# Altium PCB DT01.PcbDoc (part 3 of 3)
Units mil, origin at the board's own origin, x right, y up, seen from the top; angles counter-clockwise.
Board outline 2134.7 x 2226.1 mil, 2 copper layers (Top Layer, Bottom Layer), stack 57.918 mil thick; 95 components, 87 nets, 468 pads, 300 vias.
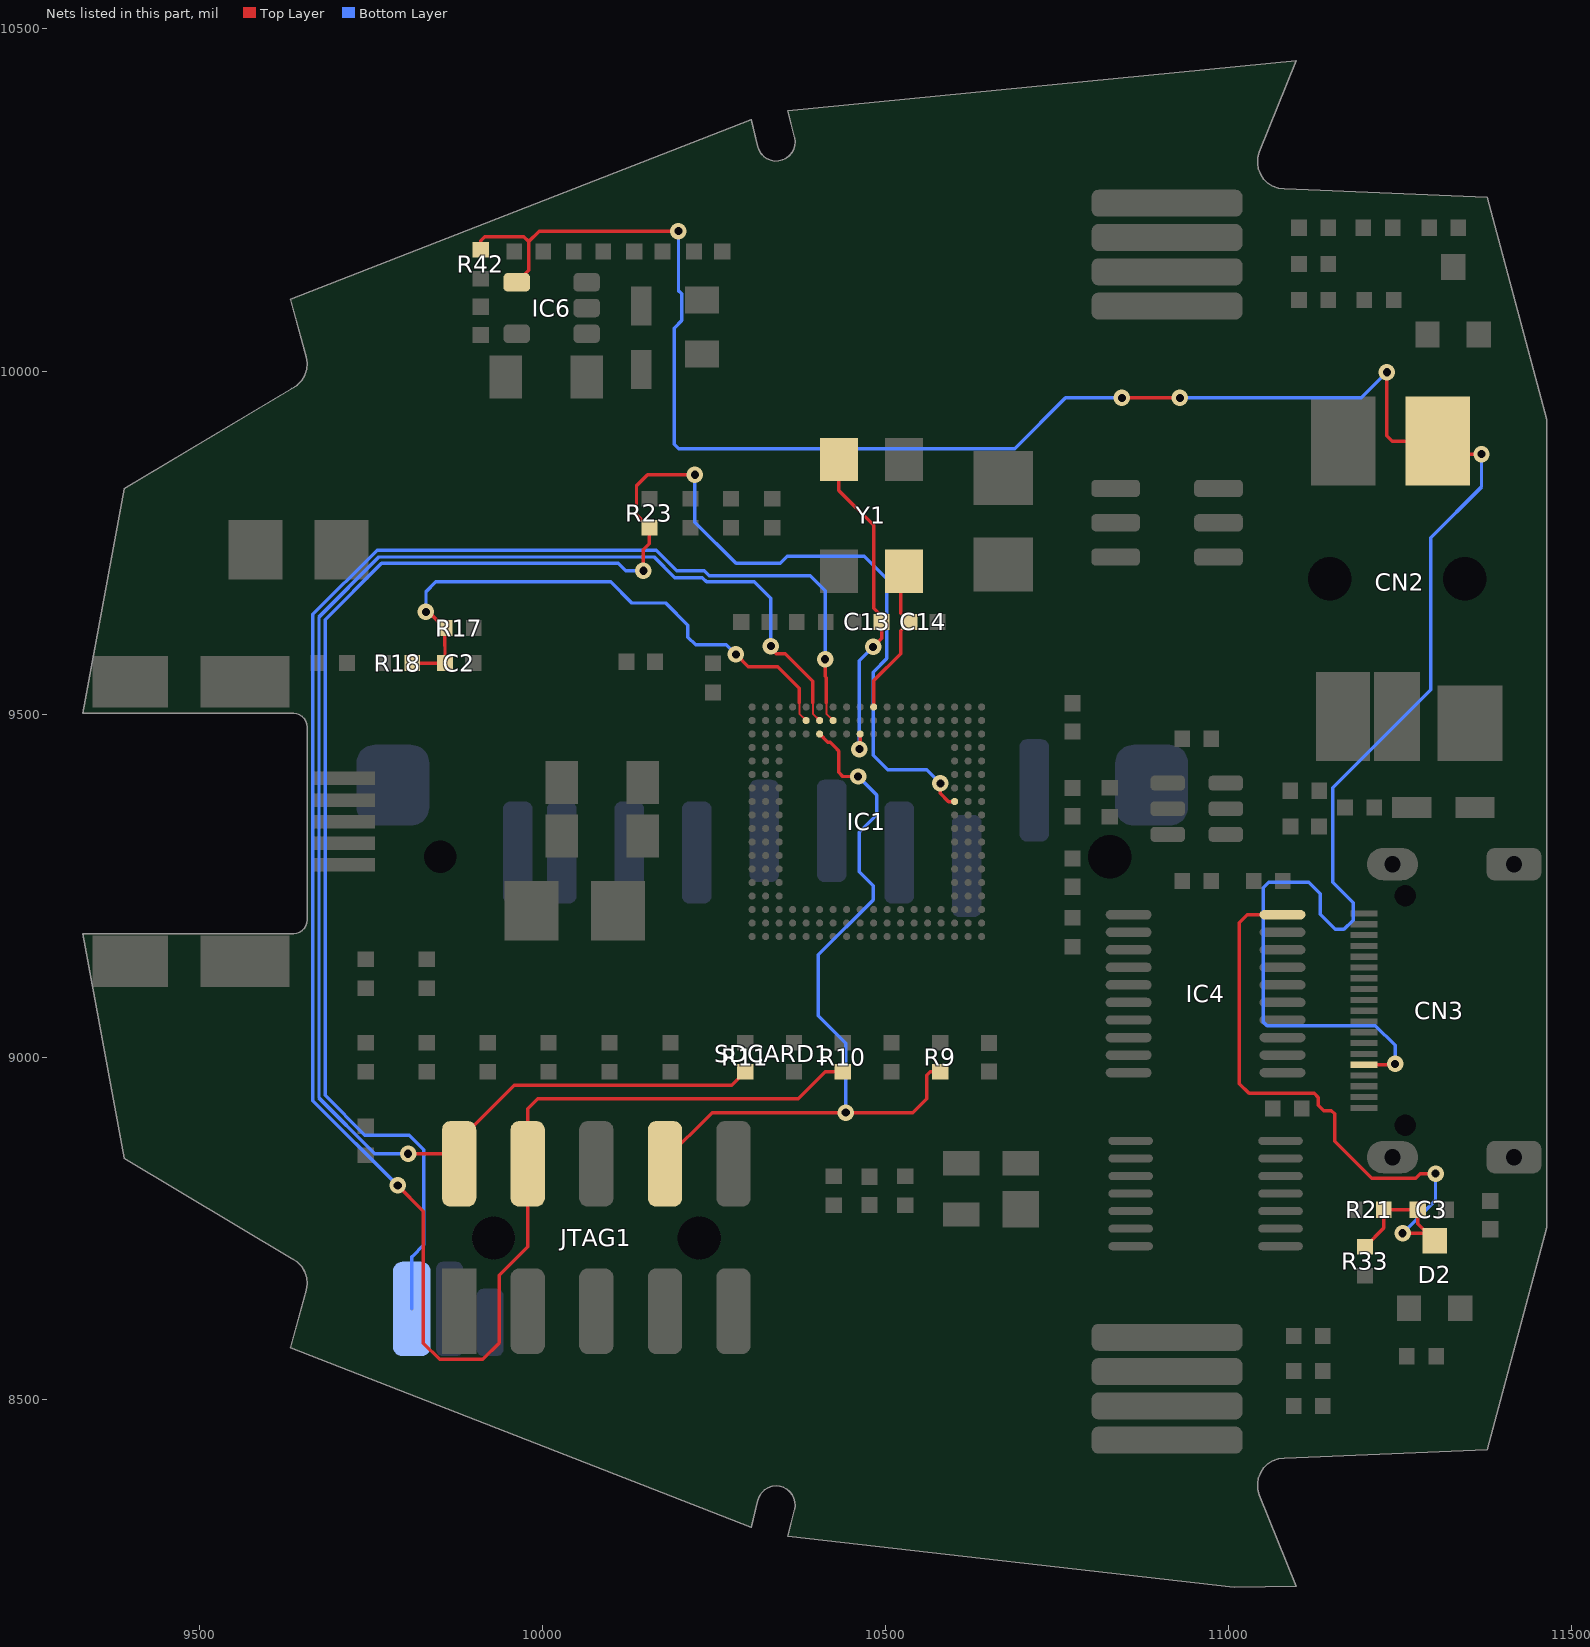
[diagram p3: the nets of this part, all layers, seen from the top]

## Via types
v1: diameter 24, hole 11.81, Top Layer to Bottom Layer, tented both sides, 295 vias
v2: diameter 24.02, hole 11.81, Top Layer to Bottom Layer, tented both sides, 5 vias

## Nets (pads, with @x,y where several pads share a name; then routed paths per layer and width w, separated by ;. In a path a pad name is that pad's centre, name@x,y a point inside that pad or via, vN(x,y) a via of type N, cw(c..) or ccw(c..) an arc to the next point about the centre after c; other vN are vias at no path point) (continued)
TDO: IC1.U13 JTAG1.2 R11.1 | length 2361.9
  Top Layer w3: 10394.06,9516.79 10394.06,9500.5 IC1.U13@10403.95,9490.61
  Top Layer w5: v1(9804.01,8859.02) JTAG1.2@9873.01,8859.02 ; JTAG1.2@9878.38,8844.21 9878.38,8878.67 9958.73,8959.02 10276.11,8959.02 R11.1@10295.6,8978.5 R11.1@10293.01,8978.5 ; v1@10333.01,9596.02 10341.01,9588.02 10354.01,9588.02 10394.06,9547.97 10394.06,9516.79
  Bottom Layer w5: v1(9804.01,8859.02) 9755.25,8859.02 9674,8940.26 9674,9641.59 9761.43,9729.02 10163.01,9729.02 10193.01,9699.02 10233.01,9699.02 10239.02,9693 10308.77,9693 10333.01,9668.76 v1(10333.01,9599.02)
TMS: IC1.U12 JTAG1.4 R10.1 | length 3104.8
  Top Layer w3: 10413.74,9516.79 10413.74,9500.5 IC1.U12@10423.63,9490.61
  Top Layer w5: v1(9788.83,8812.7) 9826.22,8775.31 9826.22,8582.63 9849.84,8559.02 9913.01,8559.02 9937.01,8583.02 9937.01,8682.02 9978.38,8723.4 JTAG1.4@9978.38,8844.21 9978.38,8924.4 9993.01,8939.02 10373.01,8939.02 10412.49,8978.5 R10.1@10437.79,8978.5 ; v1(10412.01,9580.02) 10412.01,9554.87 10413.74,9553.13 10413.74,9516.79
  Bottom Layer w5: v1(9788.83,8812.7) 9665,8936.54 9665,9645.32 9758.7,9739.02 10165.73,9739.02 10195.73,9709.02 10235.73,9709.02 10242.75,9702 10390.02,9702 10412.01,9680.02 v1(10412.01,9580.02)
TPS: C3.1 D2.3 IC4.20 R21.1 R33.1 | length 991.2
  Top Layer w5: IC4.20@11078.92,9207.48 11027.48,9207.48 11016,9196 11016,8961 11030,8947 11125,8947 11131,8941 11131,8929.65 11139,8921.65 11150.22,8921.65 11154.88,8917 11154.88,8877.12 11208.92,8823.08 11273,8823.08 11279.92,8830 v1(11302,8830) ; R33.1@11199.29,8723.57 11226.37,8750.66 R21.1@11226.37,8777.18 C3.1@11276.03,8777.18 11276.03,8756.71 D2.3@11289.75,8743 ; v1(11254,8743) D2.3@11289.75,8743 ; D2.3@11300.73,8732.02 D2.3@11289.75,8743
  Bottom Layer w5: v1(11254,8743) 11302,8791 v1(11302,8830)
TRST: IC1.T13 JTAG1.8 R9.1 | length 1153.3
  Top Layer w5: JTAG1.8@10178.38,8844.21 10178.38,8850.18 10247.22,8919.02 v1(10442.01,8919.02) 10540.01,8919.02 10560.01,8939.02 10560.01,8973.5 10565.01,8978.5 R9.1@10579.97,8978.5 ; IC1.T13@10403.01,9469.02 10403.95,9469.02 IC1.T13@10403.95,9470.92 10415.85,9459.02 10419.17,9459.02 10425.19,9453 10432.01,9446.18 10432.01,9437.02 10432,9415 10437.98,9409.02 v1(10460.01,9409.02)
  Bottom Layer w5: v1(10442.01,8919.02) 10442.01,9020.29 10402.01,9060.29 10402.01,9148.94 10482.01,9228.94 10482.01,9250.02 10462.01,9270.02 10462.01,9328.02 10487.01,9353.02 10487.01,9382.02 v1(10460.01,9409.02)
VPP_ON: CN2.4 CN3.15 IC6.4 R42.2 | length 3470.2
  Top Layer w5: R42.2@9910.37,10177.07 R42.2@9909.87,10177.06 9909.87,10190.31 9915.77,10196.21 9972.82,10196.21 9980.01,10189.02 ; IC6.4@9962.36,10129.53 9980.01,10147.18 9980.01,10189.02 ; v1(10198.18,10204.22) 9995.21,10204.22 9980.01,10189.02 ; v1(10844.66,9961.03) v1(10929.29,9961.03) ; CN3.15@11197.86,8988.84 11227.01,8988.84 11227.01,8989.02 11242.01,8989.02 v1(11243.01,8990.02) ; v1(11231.01,9998.42) 11231.01,9905.93 11238.81,9898.13 CN2.4@11305.14,9898.13 11324.25,9879.02 v1(11369.01,9879.02)
  Bottom Layer w5: v1(10198.18,10204.22) 10198.18,10117.49 10203.1,10112.57 10203.1,10073.9 10192.01,10062.81 10192.01,9893.34 10198.33,9887.02 10688.42,9887.02 10762.43,9961.03 v1(10844.66,9961.03) ; v1(10929.29,9961.03) 11193.61,9961.03 v1(11231.01,9998.42) ; v1(11243.01,8990.02) 11243.01,9016.93 11214.16,9045.77 11056.23,9045.77 11051,9051 11051,9247 11059,9255 11117,9255 11134,9238 11134,9208 11156,9186 11168.59,9186 11182.01,9199.42 11182.01,9225 11152.01,9255 11152.01,9392.56 11295.19,9535.75 11295.19,9757.32 11369.01,9831.14 v1(11369.01,9879.02)
VUSB: C2.2 IC1.U14 R17.1 R18.1 | length 841.7
  Top Layer w3: 10374.37,9516.79 10374.37,9500.5 IC1.U14@10384.26,9490.61
  Top Layer w5: R18.1@9810.02,9574.34 C2.2@9857.71,9574.34 9857.71,9599.02 9857.2,9599.53 R17.1@9857.2,9625.51 9833.69,9649.02 v1(9830.01,9649.02) ; v1(10282.01,9587.02) 10300.01,9569.02 10343.01,9569.02 10374.37,9537.65 10374.37,9516.79
  Bottom Layer w5: v1(9830.01,9649.02) 9830.01,9678.47 9844.55,9693.02 10099.24,9693.02 10130.24,9662.02 10179.67,9662.02 10212,9629.69 10212,9612 10223.11,9600.89 10268.14,9600.89 v1(10282.01,9587.02)
WP_DET: IC1.L3 R23.1 SDCARD1.SW2 | length 2652.9
  Top Layer w5: v1(10147.01,9709.02) 10147.01,9739.63 10155.87,9748.5 R23.1@10155.87,9771.61 10137.01,9790.47 10137.01,9833.02 10153.01,9849.02 v1(10222.01,9849.02) ; v1(10580.01,9399.02) 10580.01,9384.37 10591.88,9372.5 IC1.L3@10600.8,9372.5
  Bottom Layer w5: SDCARD1.SW2@9809.33,8632.63 9809.33,8709.02 9810.01,8709.02 9827.01,8726.02 9827.01,8865.02 9805.86,8886.17 9740.83,8886.17 9683,8943.99 9683,9637.86 9765.15,9720.02 10110.42,9720.02 10121.42,9709.02 v1(10147.01,9709.02) ; v1(10222.01,9849.02) 10222.01,9780.02 10282.02,9720 10346.59,9720 10356.61,9730.02 10469.28,9730.02 10502.01,9697.29 10502.01,9581.02 10482.01,9561.02 10482.01,9440.02 10503.01,9419.02 10560.01,9419.02 v1(10580.01,9399.02)
XTALI: C13.1 IC1.T10 Y1.1 | length 486.5
  Top Layer w5: Y1.1@10432.11,9869.02 Y1.1@10432.1,9871.33 10432.1,9825.96 10483.01,9775.06 10483.01,9654.36 C13.1@10498.69,9638.68 ; v1(10462.01,9449.02) 10462.01,9457.22 10463,9458.22 IC1.T10@10463,9469.02 ; IC1.T10@10462.01,9469.02 IC1.T10@10463,9469.02 ; v1(10482.01,9598.02) 10494.37,9610.38 C13.1@10494.37,9634.36 ; IC1.T10@10463,9469.02 IC1.T10@10463,9470.92 IC1.T10@10463,9469.02
  Bottom Layer w5: v1(10462.01,9449.02) 10462.01,9578.02 v1(10482.01,9598.02)
XTALO: C14.1 IC1.V9 Y1.3 | length 223.8
  Top Layer w5: IC1.V9@10482.69,9510.29 10483.01,9510.29 10483.01,9549.02 10522.01,9588.02 10522.01,9621.66 C14.1@10534.7,9634.36 ; Y1.3@10527.1,9708.33 10526.42,9708.33 10522.01,9703.92 10522.01,9647.04 C14.1@10532.02,9637.03
pads on no net: CN2.MH1 CN2.MH2 CN3.16 CN3.17 CN3.19 CN3.MH5 CN3.MH6 D1.3 IC1.A8 IC1.A9 IC1.A10 IC1.A11 IC1.A12 IC1.A13 IC1.A14 IC1.A17 IC1.A18 IC1.B3 IC1.B9 IC1.B10 IC1.B11 IC1.B12 IC1.B13 IC1.B14 IC1.B15 IC1.B16 IC1.B17 IC1.B18 IC1.C1 IC1.C2 IC1.C3 IC1.C9 IC1.C10 IC1.C11 IC1.C12 IC1.C13 IC1.C14 IC1.C15 IC1.C16 IC1.C17 IC1.C18 IC1.D1 IC1.D2 IC1.D3 IC1.D16 IC1.D17 IC1.D18 IC1.E2 IC1.E3 IC1.E16 IC1.E17 IC1.E18 IC1.F2 IC1.F3 IC1.F16 IC1.F17 IC1.F18 IC1.G2 IC1.G16 IC1.G17 IC1.G18 IC1.H17 IC1.K1 IC1.K2 IC1.K16 IC1.K17 IC1.L2 IC1.M1 IC1.M2 IC1.M3 IC1.N1 IC1.N2 IC1.N3 IC1.P3 IC1.R3 IC1.T1 IC1.T2 IC1.T3 IC1.T4 IC1.T6 IC1.T7 IC1.T8 IC1.U1 IC1.U2 IC1.U5 IC1.U6 IC1.U7 IC1.V1 IC2.3 IC2.5 IC2.6 SDCARD1.MH3 SDCARD1.MH4
copper on no net: | length 12322.3
  Top Layer w5: 13672.98,13929.05 13672.98,14024.05 14592.98,14024.05 14592.98,13929.05 13672.98,13929.05
  Top Layer w10: 6107.15,10595.13 6107.15,11057.18 6817.15,11057.18 6817.15,10595.13 6107.15,10595.13
  Top Layer w40: 10738.55,8378.48 10508.24,8378.48 cw(c10508.24,8516.27) 10508.24,8654.07 10738.55,8654.07 ; 10738.55,10032.02 10508.24,10032.02 cw(c10508.24,10169.82) 10508.24,10307.61 10738.55,10307.61
  Bottom Layer w5: 13672.98,13834.05 13672.98,13929.05 14592.98,13929.05 14592.98,13834.05 13672.98,13834.05
  Bottom Layer w10: 6107.15,10595.13 6107.15,11057.18 6817.15,11057.18 6817.15,10595.13 6107.15,10595.13
  Bottom Layer w40: 10738.55,8378.48 10508.24,8378.48 cw(c10508.24,8516.27) 10508.24,8654.07 10738.55,8654.07 ; 10738.55,10032.02 10508.24,10032.02 cw(c10508.24,10169.82) 10508.24,10307.61 10738.55,10307.61
  other v2: 10830.98,9882.99 10932.01,9882.99 10820,10045 11197.01,10052.99

## Polygon pours and split planes (outlines as drawn)
GND on Top Layer "TOPGND" (solid, remove dead copper, pour order 1000): 11097.83,8230.7 11044.32,8363.83 11042.45,8378.76 11053.27,8408.28 11080.68,8417.88 11228.42,8421.07 11376.58,8429.84 11425.22,8590.32 11463.13,8754.11 11463.13,9931.98 11432.11,10071.24 11376.58,10256.24 11226.46,10265.09 11080.68,10268.2 11065.08,10270.99 11053.27,10278.86 11043.43,10293.62 11041.46,10307.4 11044.32,10322.26 11097.83,10455.38 10842.7,10453.03 10592.76,10426.46 10471.73,10405.8 10356.73,10382.38 10366.39,10343.02 10367.42,10331.02 10364.47,10323.14 10352.66,10311.34 10335.94,10308.38 10319.21,10317.24 10312.86,10329.88 10303.15,10369.43 10081.08,10304.45 9861.65,10218.84 9631.51,10107.14 9654.65,10023.4 9656.98,10015.15 9655.01,10003.34 9650.09,9989.57 9633.7,9977.41 9512.33,9916.75 9388.86,9831.12 9351.94,9676.66 9328.42,9503.48 9636.2,9503.48 9654.02,9489.7 9655.89,9202.3 9636.2,9182.61 9328.42,9182.61 9349.97,9017.38 9388.86,8854.97 9510.36,8775.31 9633.7,8708.68 9644.18,8701.51 9651.07,8693.64 9655.01,8683.8 9655.99,8674.94 9654.65,8662.69 9631.51,8578.94 9799.66,8493.89 9916.75,8444.69 10041.72,8394.5 10250.33,8329.56 10303.15,8316.66 10312.86,8356.21 10317.24,8364.98 10321.18,8370.89 10329.05,8375.81 10335.94,8377.78 10344.79,8376.79 10351.68,8374.82 10359.55,8369.9 10362.5,8365.97 10366.44,8359.08 10367.42,8352.19 10366.39,8343.07 10356.73,8303.7 10547.5,8266.58 10673.45,8248.87 10751.18,8241 10825.97,8235.1 10899.77,8231.16 10941.1,8230.18 11009.98,8230.18 11023.75,8229.19 11036.54,8230.18 11062.13,8231.16
GND on Bottom Layer "BOTGND" (solid, remove dead copper, pour order 1001): 11097.83,8230.7 11044.32,8363.83 11042.45,8378.76 11053.27,8408.28 11080.68,8417.88 11228.42,8421.07 11376.58,8429.84 11425.22,8590.32 11463.13,8754.11 11463.13,9931.98 11432.11,10071.24 11376.58,10256.24 11226.46,10265.09 11080.68,10268.2 11065.08,10270.99 11053.27,10278.86 11043.43,10293.62 11041.46,10307.4 11044.32,10322.26 11097.83,10455.38 10842.7,10453.03 10592.76,10426.46 10471.73,10405.8 10356.73,10382.38 10366.39,10343.02 10367.42,10331.02 10364.47,10323.14 10352.66,10311.34 10335.94,10308.38 10319.21,10317.24 10312.86,10329.88 10303.15,10369.43 10081.08,10304.45 9861.65,10218.84 9631.51,10107.14 9654.65,10023.4 9656.98,10015.15 9655.01,10003.34 9650.09,9989.57 9633.7,9977.41 9512.33,9916.75 9388.86,9831.12 9351.94,9676.66 9328.42,9503.48 9636.2,9503.48 9654.02,9489.7 9655.89,9202.3 9636.2,9182.61 9328.42,9182.61 9349.97,9017.38 9388.86,8854.97 9510.36,8775.31 9633.7,8708.68 9644.18,8701.51 9651.07,8693.64 9655.01,8683.8 9655.99,8674.94 9654.65,8662.69 9631.51,8578.94 9799.66,8493.89 9916.75,8444.69 10041.72,8394.5 10250.33,8329.56 10303.15,8316.66 10312.86,8356.21 10317.24,8364.98 10321.18,8370.89 10329.05,8375.81 10335.94,8377.78 10344.79,8376.79 10351.68,8374.82 10359.55,8369.9 10362.5,8365.97 10366.44,8359.08 10367.42,8352.19 10366.39,8343.07 10356.73,8303.7 10547.5,8266.58 10673.45,8248.87 10751.18,8241 10825.97,8235.1 10899.77,8231.16 10941.1,8230.18 11009.98,8230.18 11023.75,8229.19 11036.54,8230.18 11062.13,8231.16
no net on Keep-Out Layer (solid): 10738.55,10307.61 10509.06,10307.61 10499.2,10307.5 10488.4,10306.4 10481.5,10304.7 10474.7,10303.5 10463.7,10300.3 10451.3,10295.4 10441.4,10290.7 10428.3,10281.8 10417.61,10273.94 10409.1,10265.8 10401.9,10257.4 10394,10246.7 10387.3,10235.4 10381,10222.8 10377,10211.8 10372.8,10195.3 10371.4,10183.9 10370.5,10172.6 10371.1,10154.4 10374,10138.3 10377,10126.7 10382.5,10113.2 10387.9,10102.9 10398.5,10085.8 10412.3,10070.8 10426.5,10059.1 10435.2,10052.9 10446.7,10046.5 10463.6,10039.5 10473.8,10036.5 10487,10033.6 10491.9,10033 10495.4,10032.6 10501.1,10032.1 10508.24,10032.02 10738.55,10032.02 10741.1,10032.2 10743,10032.5 10745.4,10033.3 10747.1,10034 10748.8,10034.9 10750.3,10035.8 10751.2,10036.8 10752.5,10037.8 10754.6,10040.3 10756,10042.3 10757.1,10045 10757.8,10047.6 10758.2,10050 10758.24,10051.71 10758.24,10287.93 10757.8,10291.7 10757.2,10294.6 10755.4,10298.3 10753.15,10301.5 10750.9,10303.5 10748,10305.2 10744,10307
no net on Keep-Out Layer (solid): 10738.55,8654.07 10509.06,8654.07 10499.2,8653.96 10488.4,8652.86 10481.5,8651.16 10474.7,8649.96 10463.7,8646.76 10451.3,8641.86 10441.4,8637.16 10428.3,8628.26 10417.61,8620.4 10409.1,8612.26 10401.9,8603.86 10394,8593.16 10387.3,8581.86 10381,8569.26 10377,8558.26 10372.8,8541.76 10371.4,8530.36 10370.5,8519.06 10371.1,8500.86 10374,8484.76 10377,8473.16 10382.5,8459.66 10387.9,8449.36 10398.5,8432.26 10412.3,8417.26 10426.5,8405.56 10435.2,8399.36 10446.7,8392.96 10463.6,8385.96 10473.8,8382.96 10487,8380.06 10491.9,8379.46 10495.4,8379.06 10501.1,8378.56 10508.24,8378.48 10738.55,8378.48 10741.1,8378.66 10743,8378.96 10745.4,8379.76 10747.1,8380.46 10748.8,8381.36 10750.3,8382.26 10751.2,8383.26 10752.5,8384.26 10754.6,8386.76 10756,8388.76 10757.1,8391.46 10757.8,8394.06 10758.2,8396.46 10758.24,8398.16 10758.24,8634.38 10757.8,8638.16 10757.2,8641.06 10755.4,8644.76 10753.15,8647.95 10750.9,8649.96 10748,8651.66 10744,8653.46

## Keep-outs
Keep-Out Layer:
  rectangle: 13672.98,12418.05 13862.98,12513.05
  lines w5: 13672.98,12418.05 13672.98,12513.05 14592.98,12513.05 14592.98,12418.05 13672.98,12418.05
  text "ROUTING KEEPOUT LAYER" at 13932.98,12445.05 h35

## Other copper
Top Layer:
  rectangle net 5V0: 9708,9252 9732,9285
  rectangle: 13672.98,13929.05 13862.98,14024.05
  pour cut-out: 10305.52,9510.29 10640.17,9510.29 10640.17,9175.65 10305.52,9175.65
  text "TOP LAYER" at 13932.98,13956.05 h40
  text "LAYER" at 6337.58,10910.08 h60
  text "TOP" at 6310.02,10701.42 h120
Bottom Layer:
  rectangle: 13672.98,13834.05 13862.98,13929.05
  text "BOTTOM LAYER" at 13932.98,13861.05 h40
  text "LAYER" at 6337.58,10910.08 h60
  text "BOTTOM" at 6148.6,10705.35 h120
Multi-Layer:
  rectangle: 13672.98,13008.05 13862.98,13103.05
  lines w5: 13672.98,13008.05 13672.98,13103.05 14592.98,13103.05 14592.98,13008.05 13672.98,13008.05
  text "MULTILAYER" at 13932.98,13035.05 h40
  text "OF" at 22030.96,501.86 h80
  text "1" at 21835.88,501.31 h120
  text "1" at 22270.88,501.31 h120

## Silkscreen, mask and mechanical layers (free items; w line width, h text height)
Top Overlay:
  drawing of 466 lines, arcs and shapes, not listed
  text "TOP OVERLAY" at 13932.98,14192.05 h40
  text "K" at 10300.56,10129.75 h30
  text "FLAT" at 10898,10013 h40
  text "+" at 9767,9803 h80
  text "DS2406" at 10916.8,9722.6 h35 r90
  text "+" at 10739,9615 h80
  text "STX-2550-5N" at 11105.91,9609.87 h35 r90
  text "K" at 11401,9350 h30
  text "LPC288x" at 10260,9263 h40 r90
  text "+" at 9889,9100 h80
  text "74CBT3345" at 10992.76,8974.48 h28 r90
  text "INTERFACE" at 11368,8946 h50 r90
  text "G3168-05000102-00" at 11414.8,8927.2 h35 r90
  text "TARGET JTAG" at 11321.57,8915.39 h50 r90
  text "HC04" at 10996,8736 h34 r90
  text "FLAT" at 10877,8360 h40
Bottom Overlay:
  drawing of 1101 lines, arcs and shapes, not listed
  text "BOTTOM LEGEND" at 13932.98,13625.05 h40
  text "SD CARD" at 10491,9902 h80
  text "MANUFACTURE DATE:" at 11291,9740 h28 r90
  text "REVISION No:" at 10588,9732.29 h50
  text "DT01.02" at 11198,9655 h60 r90
  text "SVN 7266" at 10591,9640.36 h95
  text "MACHINE ID:" at 10588,9542.58 h50
  text ".ComputerName" at 10591,9453 h95
  text "DT01.02" at 11369.67,9244.43 h90 r90
  text "Developer" at 11426.67,9244.43 h60 r90
  text "Tool" at 11491.67,9244.43 h60 r90
  text "AD BUILD No:" at 10588,9109.58 h50
  text "COMPLIANCE" at 9755.08,9029.05 h52
  text ".Application_BuildNumber" at 10591,9020 h95
  text "IPC-A-600G" at 9712.08,8961.05 h30
  text "IPC-6012D" at 9712.08,8903.05 h30
Top Paste:
  rectangle: 13672.98,14283.05 13862.98,14378.05
  lines w5: 13672.98,14283.05 13672.98,14378.05 14592.98,14378.05 14592.98,14283.05 13672.98,14283.05
  text "TOP PASTE" at 13932.98,14310.05 h40
Bottom Paste:
  rectangle: 13672.98,13480.05 13862.98,13575.05
  lines w5: 13672.98,13480.05 13672.98,13575.05 14592.98,13575.05 14592.98,13480.05 13672.98,13480.05
  text "BOTTOM PASTE" at 13932.98,13507.05 h40
Top Solder:
  rectangle: 13672.98,14047.05 13862.98,14142.05
  lines w5: 13672.98,14047.05 14592.98,14047.05 14592.98,14142.05 13672.98,14142.05 13672.98,14047.05
  lines w40: 10738.55,8378.48 10508.24,8378.48 cw(c10508.24,8516.27) 10508.24,8654.07 10738.55,8654.07 ; 10738.55,10032.02 10508.24,10032.02 cw(c10508.24,10169.82) 10508.24,10307.61 10738.55,10307.61
  lines w60: 9622,9182.61 9366.52,9182.61 9328.42,9182.61 ccw(c11116.51,9343.04) 9388.86,8854.97 ccw(c10303.51,10107.8) 9633.7,8708.68 cw(c9616.7,8673.17) 9654.65,8662.69 9631.51,8578.94 ccw(c11007.41,11111.18) 10303.15,8316.66 10312.86,8356.21 cw(c10339.63,8349.64) 10366.39,8343.07 10356.73,8303.7 ccw(c11007.41,11111.18) 11097.83,8230.7 11044.32,8363.83 cw(c11080.85,8378.51) 11080.68,8417.88 ccw(c11063.75,12502.73) 11376.58,8429.84 ccw(c8605.87,9343.04) 11463.13,8754.11 11463.13,9287.93 11463.13,9520.21 11463.13,9697.37 11463.13,9931.98 ccw(c8605.87,9343.04) 11376.58,10256.24 ccw(c11063.75,6183.36) 11080.68,10268.2 cw(c11080.85,10307.57) 11044.32,10322.26 11097.83,10455.38 ccw(c11007.41,7574.91) 10356.73,10382.38 10366.39,10343.02 cw(c10339.63,10336.45) 10312.86,10329.88 10303.15,10369.43 ccw(c11007.41,7574.91) 9631.51,10107.14 9654.65,10023.4 cw(c9616.7,10012.92) 9633.7,9977.41 ccw(c10303.51,8578.29) 9388.86,9831.12 ccw(c11116.51,9343.04) 9328.42,9503.48 9366.52,9503.48 9622,9503.48
  text "TOP SOLDER MASK" at 13932.98,14074.05 h40
Bottom Solder:
  rectangle: 13672.98,13716.05 13862.98,13811.05
  lines w5: 13672.98,13716.05 13672.98,13811.05 14592.98,13811.05 14592.98,13716.05 13672.98,13716.05
  lines w40: 10738.55,8378.48 10508.24,8378.48 cw(c10508.24,8516.27) 10508.24,8654.07 10738.55,8654.07 ; 10738.55,10032.02 10508.24,10032.02 cw(c10508.24,10169.82) 10508.24,10307.61 10738.55,10307.61
  lines w60: 9622,9182.61 9366.52,9182.61 9328.42,9182.61 ccw(c11116.51,9343.04) 9388.86,8854.97 ccw(c10303.51,10107.8) 9633.7,8708.68 cw(c9616.7,8673.17) 9654.65,8662.69 9631.51,8578.94 ccw(c11007.41,11111.18) 10303.15,8316.66 10312.86,8356.21 cw(c10339.63,8349.64) 10366.39,8343.07 10356.73,8303.7 ccw(c11007.41,11111.18) 11097.83,8230.7 11044.32,8363.83 cw(c11080.85,8378.51) 11080.68,8417.88 ccw(c11063.75,12502.73) 11376.58,8429.84 ccw(c8605.87,9343.04) 11463.13,8754.11 11463.13,9287.93 11463.13,9520.21 11463.13,9697.37 11463.13,9931.98 ccw(c8605.87,9343.04) 11376.58,10256.24 ccw(c11063.75,6183.36) 11080.68,10268.2 cw(c11080.85,10307.57) 11044.32,10322.26 11097.83,10455.38 ccw(c11007.41,7574.91) 10356.73,10382.38 10366.39,10343.02 cw(c10339.63,10336.45) 10312.86,10329.88 10303.15,10369.43 ccw(c11007.41,7574.91) 9631.51,10107.14 9654.65,10023.4 cw(c9616.7,10012.92) 9633.7,9977.41 ccw(c10303.51,8578.29) 9388.86,9831.12 ccw(c11116.51,9343.04) 9328.42,9503.48 9366.52,9503.48 9622,9503.48
  text "BOTTOM SOLDER MASK" at 13932.98,13743.05 h40
Drill Guide:
  rectangle: 13672.98,13362.05 13862.98,13457.05
  lines w5: 13672.98,13362.05 14592.98,13362.05 14592.98,13457.05 13672.98,13457.05 13672.98,13362.05
  lines w10: 9329.39,9180.02 9637.16,9180.02 9641.54,9180.52 9645.7,9181.97 9649.44,9184.32 9652.55,9187.43 9654.9,9191.17 9656.35,9195.33 9656.85,9199.71 9656.85,9481.2 9656.35,9485.58 9654.9,9489.74 9652.55,9493.48 9649.44,9496.59 9645.7,9498.94 9641.54,9500.39 9637.16,9500.89 9329.39,9500.89 9389.82,9828.53 9634.66,9974.82 9642.38,9979.68 9648.77,9986.2 9653.49,9994.01 9656.28,10002.7 9657,10011.79 9655.61,10020.81 9632.47,10104.55 10304.11,10366.84 10313.82,10327.29 10315.77,10321.87 10318.81,10316.97 10322.8,10312.81 10327.56,10309.57 10332.89,10307.39 10338.56,10306.37 10344.32,10306.55 10349.92,10307.93 10355.11,10310.43 10359.66,10313.96 10363.38,10318.36 10366.1,10323.44 10367.71,10328.97 10368.13,10334.72 10367.35,10340.43 10357.69,10379.8 11098.79,10452.79 11045.28,10319.67 11042.98,10311.48 11042.49,10302.98 11043.84,10294.58 11046.96,10286.67 11051.71,10279.61 11057.86,10273.73 11065.14,10269.32 11073.19,10266.57 11081.64,10265.62 11377.54,10253.65 11464.09,9929.39 11464.09,8751.52 11377.54,8427.26 11081.64,8415.29 11073.19,8414.34 11065.14,8411.59 11057.86,8407.18 11051.71,8401.3 11046.96,8394.24 11043.84,8386.33 11042.49,8377.93 11042.98,8369.43 11045.28,8361.24 11098.79,8228.12 11008.37,8226.7 10357.69,8301.11 10367.35,8340.48 10368.12,8345.97 10367.79,8351.49 10366.35,8356.84 10363.87,8361.79 10360.45,8366.15 10356.24,8369.74 10351.38,8372.41 10346.1,8374.06 10340.59,8374.61 10334.53,8373.94 10328.76,8371.95 10323.58,8368.74 10319.23,8364.47 10315.92,8359.35 10313.82,8353.62 10304.11,8314.07 9632.47,8576.36 9655.61,8660.1 9657,8669.12 9656.28,8678.21 9653.49,8686.9 9648.77,8694.71 9642.38,8701.23 9634.66,8706.09 9389.82,8852.38 9329.39,9180.02
  lines w66.93: 10508.18,8412.67 cw(c10508.25,8516.25) 10508.25,8619.83 10724.04,8619.87 10724.04,8412.67 10508.25,8412.67 ; 10508.18,10066.21 cw(c10508.25,10169.8) 10508.25,10273.38 10724.04,10273.42 10724.04,10066.21 10508.25,10066.21
  text "DRILL GUIDE (SLOTS)" at 13932.98,13389.05 h40
Mechanical 1:
  rectangle: 13672.98,13126.05 13862.98,13221.05
  rectangle: 13584.61,7299.25 15028.78,7361.12
  rectangle: 13584.61,7537.39 15028.78,7599.25
  lines w0.39: 9328.42,9182.61 ccw(c11116.51,9343.04) 9388.86,8854.97 ccw(c10303.51,10107.8) 9633.7,8708.68 cw(c9616.7,8673.17) 9654.65,8662.69 9631.51,8578.94 ccw(c11007.41,11111.18) 10303.15,8316.66 10312.86,8356.21 cw(c10339.63,8349.64) 10366.39,8343.07 10356.73,8303.7 ccw(c11007.41,11111.18) 11097.83,8230.7 11044.32,8363.83 cw(c11080.85,8378.51) 11080.68,8417.88 ccw(c11063.75,12502.73) 11376.58,8429.84 ccw(c8605.87,9343.04) 11463.13,8754.11 11463.13,9287.93 11463.13,9520.21 11463.13,9697.37 11463.13,9931.98 ccw(c8605.87,9343.04) 11376.58,10256.24 ccw(c11063.75,6183.36) 11080.68,10268.2 cw(c11080.85,10307.57) 11044.32,10322.26 11097.83,10455.38 ccw(c11007.41,7574.91) 10356.73,10382.38 10366.39,10343.02 cw(c10339.63,10336.45) 10312.86,10329.88 10303.15,10369.43 ccw(c11007.41,7574.91) 9631.51,10107.14 9654.65,10023.4 cw(c9616.7,10012.92) 9633.7,9977.41 ccw(c10303.51,8578.29) 9388.86,9831.12 ccw(c11116.51,9343.04) 9328.42,9503.48 9366.52,9503.48 9535.81,9503.48 9636.2,9503.48 cw(c9636.2,9483.79) 9655.89,9483.79 9655.89,9202.3 cw(c9636.2,9202.3) 9636.2,9182.61 9535.81,9182.61 9366.52,9182.61 9328.42,9182.61 ; 10508.24,8378.48 cw(c10508.24,8516.27) 10508.24,8654.07 10738.55,8654.07 cw(c10738.55,8634.38) 10758.24,8634.38 10758.24,8601.11 10758.24,8398.16 cw(c10738.55,8398.16) 10738.55,8378.48 10508.24,8378.48 ; 10508.24,10032.02 cw(c10508.24,10169.82) 10508.24,10307.61 10738.55,10307.61 cw(c10738.55,10287.93) 10758.24,10287.93 10758.24,10084.97 10758.24,10051.71 cw(c10738.55,10051.71) 10738.55,10032.02 10508.24,10032.02
  lines w5: 13672.98,13126.05 14592.98,13126.05 14592.98,13221.05 13672.98,13221.05 13672.98,13126.05
  lines w10: 13584.61,7299.25 13584.61,7599.25 15028.78,7599.25 15028.78,7299.25 13584.61,7299.25
  lines w12.01: 11376.58,8429.84 13584.63,7453.88
  text "BOARD OUTLINE" at 13932.98,13153.05 h40
  text "PCB BOARD OUTLINE" at 13745.65,7405.38 h80
Mechanical 3:
  rectangle: 13672.98,12890.05 13862.98,12985.05
  lines w5: 13672.98,12890.05 13672.98,12985.05 14592.98,12985.05 14592.98,12890.05 13672.98,12890.05
  lines w6: 6164.15,9211.91 6774.15,9211.91 6774.15,9461.91 6164.15,9461.91 6164.15,9211.91
  lines w8: 21948,2634 22873,2634
  lines w10: 6823,9270 9357,8957 ; 13762.98,14468.05 14532.98,14468.05 ; 6118.72,8557.91 6828.72,8557.91 6828.72,10001.91 6118.72,10001.91 6118.72,8557.91 ; 13572.98,12331.05 14702.98,12331.05 14702.98,14688.05 13572.98,14688.05 13572.98,12331.05
  lines w15: 6194.15,9801.91 6434.15,9801.91
  text "3 TRACK" at 17927.8,15741.57 h69
  text "24 VIA" at 18492.8,15741.57 h69
  text "3 SPACE" at 18992.8,15741.57 h69
  text "54.22mm" at 19763.55,15733.54 h69
  text "51.45mm" at 20507.64,15733.54 h69
  text "DS" at 19684,14937.36 h69
  text "X" at 19532.96,14935.36 h69
  text "LAYER USAGE" at 13762.98,14496.05 h80
  text "FEED THRU'" at 18968.18,14386.86 h69
  text "TENTED" at 19921,14386.86 h69
  text "X" at 19744,14384.86 h69
  text "X" at 18778.14,14383.36 h69
  text "UNIQUE DRILL" at 18968.18,14189.86 h69
  text "X" at 18778,14185.86 h69
  text "X" at 21405,14012.86 h69
  text "AS SHOWN" at 21555,14012.86 h69
  text "X" at 20335,13817.86 h69
  text "CAD" at 20492,13816.86 h69
  text "1" at 22563.37,13232.05 h69
  text "DT01.02" at 18014.96,13213.86 h69
  text "DEVELOPMENT TOOL 01.02" at 19634.96,13213.86 h69
  text "TECHNICAL DATA" at 13932.98,12917.05 h40
  text "NOTE" at 6190.15,9844.91 h70
  text "DRILL DRAWING" at 18167.43,9824.55 h69
  text "APERTURE TABLES\FILES ARE EMBEDDED" at 19776.43,9824.55 h69
  text "1" at 22562.3,9822.33 h69
  text "BOARDS HAVE" at 6190.15,9664.91 h50
  text "PLATED EDGES" at 6190.15,9564.91 h50
  text "TUC-722" at 22372.81,9540 h69
  text "X" at 22182.77,9537 h69
  text "MILL CUTOUTS" at 6224.15,9361.91 h50
  text "1.2mm" at 20000,9353 h69
  text "X" at 19809.96,9350 h69
  text "BEFORE PLATING" at 6200.15,9274.91 h50
  text "X" at 19101.57,9177.84 h68.9
  text "IN A/W ANSI IPC-6012 TYPE 2 CLASS 2" at 19291,9176.5 h69
  text "ALL" at 6392.59,9029.91 h50
  text "X" at 19100,9000.5 h69
  text "IN A/W ANSI IPC-6012 TYPE 2 CLASS 2" at 19291,8999.5 h69
  text "SIDES ARE" at 6274.88,8936.91 h50
  text "PLATED BY" at 6262.15,8846.91 h50
  text "DESIGN" at 6339.15,8756.91 h50
  text "35um (1oz)" at 20492,8643 h69
  text "X" at 20301.96,8640 h69
  text "35um (1oz)" at 20492,8466 h69
  text "X" at 20301.96,8463 h69
  text "35um (1oz)" at 20492,8290 h69
  text "X" at 20301.96,8287 h69
  text "AS SHOWN" at 21614,7917.5 h69
  text "X" at 21420,7916.5 h69
  text "X" at 19105,7622.5 h69
  text "COMPONENT SIDE" at 19291,7622.5 h69
  text "X" at 19105,7446.5 h69
  text "X" at 21930,7446.5 h69
  text "AS SHOWN" at 19291,7444.5 h69
  text "NC_ DRILL FILES" at 22126,7444.5 h69
  text "20um" at 20492,7266.5 h69
  text "X" at 20300,7265.5 h69
  text "AS SHOWN" at 21082.5,6909 h69
  text "X" at 20892.47,6908.36 h69
  text "X" at 20896,6517.5 h69
  text "X" at 21940,6517.5 h69
  text "COMPONENT" at 21082,6515.5 h69
  text "SOLDER" at 22126,6515.5 h69
  text "WHITE" at 19291,6338.5 h69
  text "X" at 19097.76,6335.66 h69
  text "SCREEN PRINT" at 21082,6142.5 h69
  text "X" at 20891.96,6138 h69
  text "BLACK" at 22099.96,5964.36 h69
  text "GLOSS" at 19291,5963 h69
  text "X" at 19100.96,5960 h69
  text "X" at 21935.96,5960 h69
  text "3um IMMERSION GOLD SMOBC (SOLDER MASK OVER BARE COPPER)" at 19291,5217.5 h69
  text "X" at 19102.05,5212.18 h69
  text "X" at 19100,4667.5 h69
  text "CUT AND TRIM ACCORDING TO LAYER MECHANICAL 1 (BOARD OUTLINE)" at 19291,4665.5 h69
  text "N.C. ROUTE" at 20256,4133 h69
  text "X" at 20065.96,4132.36 h69
  text "X" at 19101.5,3667.5 h69
  text "IN A/W ANSI IPC-A-600F" at 19290.5,3661.5 h69
  text "2" at 21378.5,3661.5 h69
  text "X" at 21227.56,3656.18 h69
  text "NONE" at 19290.5,3011.5 h69
  text "X" at 19099.29,3005.55 h69
  text "2" at 22558,2833.5 h69
  text "X" at 22367.96,2829 h69
  text "PER ORDER" at 22085.96,2661.86 h69
  text "OTHER" at 21633,2654 h69
  text "X" at 21445.75,2645.79 h69
  text "X" at 20641,2481.5 h69
  text "REQUIRED" at 20841,2478.5 h69
  text "2 SIDES" at 20963.71,2300.5 h69
  text "0.65MM" at 22329.66,2298.07 h69
  text "X" at 20769.96,2291.36 h69
  text "LEGEND" at 20964,2124.5 h69
  text "X" at 20773.96,2120 h69
  text "X" at 19930,1946.5 h69
  text "IS09001/AS3901" at 20117,1946.5 h69
  text "X" at 19628.62,1751.5 h69
  text "PER ORDER" at 19825.62,1750.5 h69
Mechanical 6:
  drawing of 2027 lines, arcs and shapes, not listed
  text "DESIGN INFORMATION" at 17933,16019.36 h79
  text "PRODUCT FAMILY" at 1046.66,15989.53 h118.11
  text "DRAWING ID/MODEL." at 3940.36,15989.53 h118.11
  text "(REFER ALSO PROFILING INFORMATION)" at 20450,15870.36 h69
  text "BOARD TECHNOLOGY" at 17933,15861.36 h75
  text "BOARD SIZE" at 19764,15861.36 h75
  text "X" at 20382.96,15725.86 h69
  text "(MIN. TRACK / PADS / CLEARANCE" at 17935,15555.36 h69
  text "IN 0.001\" )" at 19706,15555.36 h69
  text "EXTERNAL" at 19987,15435.36 h69
  text "PER IPC-D-275 CLASS 2" at 20539,15435.36 h69
  text "LEVEL C AND IS THE" at 21867,15435.36 h69
  text "MINIMUM ANNULAR RING 0.05MM" at 17935,15434.36 h69
  text "(0.002\")" at 19529,15434.36 h69
  text "MANUFACTURING REGISTRATION" at 17940,15317.36 h69
  text "ALLOWANCE" at 19495,15317.36 h69
  text "CIRCUIT TYPE:" at 17933,14937.36 h75
  text "SS" at 18933.12,14937.36 h69
  text "PTH MULTILAYER" at 20491,14937.36 h69
  text "Number of Layers :" at 21555,14937.36 h69
  text "FINGER CONNECTOR DIM PER:" at 17933,14760.36 h75
  text "AS SHOWN" at 21555,14760.36 h69
  text "No. OFF TOTAL" at 18957,14602.36 h69
  text "BOTH SIDES" at 21555,14583.86 h69
  text "ONE SIDE" at 20492,14582.36 h69
  text "BUILD STATISTICS" at 12517.23,14567.75 h60
  text "BUILD STATISTICS" at 12517.23,14567.75 h60
  text "GENERAL" at 12509.23,14421.75 h40
  text "GENERAL" at 12509.23,14421.75 h40
  text "VIAS:" at 17933,14385.36 h75
  text "BURIED LAYER SEQUENCE" at 20866,14385.36 h69
  text "NONE" at 18428.35,14384.34 h69
  text ".Net_Count" at 12890.23,14338.75 h40
  text ".Net_Count" at 12890.23,14338.75 h40
  text "NETS" at 12512.23,14336.75 h35
  text "NETS" at 12512.23,14336.75 h35
  text ".Component_Count" at 12890.23,14256.75 h40
  text ".Component_Count" at 12890.23,14256.75 h40
  text "COMPONENTS" at 12513.23,14255.75 h35
  text "COMPONENTS" at 12513.23,14255.75 h35
  text "2 SIZES" at 19921,14188.36 h69
  text "BLIND LAYER SEQUENCE" at 20866,14188.36 h69
  text "PRIMITIVES" at 12510.23,14118.75 h40
  text "PRIMITIVES" at 12510.23,14118.75 h40
  text ".Fill_Count" at 12890.23,14034.75 h40
  text ".Fill_Count" at 12890.23,14034.75 h40
  text "FILLS" at 12513.23,14033.75 h35
  text "FILLS" at 12513.23,14033.75 h35
  text "LAYER CONSTRUCTION PER:" at 17933,14011.36 h75
  text "LAMINATION SEQUENCE" at 19744,14011.36 h69
  text ".Track_Count" at 12890.23,13953.75 h40
  text ".Track_Count" at 12890.23,13953.75 h40
  text "TRACKS" at 12513.23,13951.75 h35
  text "TRACKS" at 12513.23,13951.75 h35
  text ".String_Count" at 12890.23,13871.75 h40
  text ".String_Count" at 12890.23,13871.75 h40
  text "STRINGS" at 12513.23,13869.75 h35
  text "STRINGS" at 12513.23,13869.75 h35
  text "NB2.05" at 21428.47,13843.78 h70
  text "FILE NAME:" at 20881.34,13832.08 h69
  text "ARTWORK:" at 17933,13815.36 h75
  text "MANUAL" at 18932.8,13815.36 h69
  text "DIGITISED" at 19685,13815.36 h69
  text ".Arc_Count" at 12890.23,13788.75 h40
  text ".Arc_Count" at 12890.23,13788.75 h40
  text "ARC'S" at 12513.23,13786.75 h35
  text "ARC'S" at 12513.23,13786.75 h35
  text "IMPEDANCE CONTROLLED" at 7382,13741 h75
  text "GERBER SET" at 21428.47,13729.6 h69
  text "FILE TYPE:" at 20881.34,13727.08 h69
  text "LANDS" at 12509.23,13667.75 h40
  text "LANDS" at 12509.23,13667.75 h40
  text "ROUTES" at 7382,13606 h75
  text ".Pad_Count" at 12890.23,13583.75 h40
  text ".Pad_Count" at 12890.23,13583.75 h40
  text "PADS" at 12513.23,13581.75 h35
  text "PADS" at 12513.23,13581.75 h35
  text "SUPPLIED ARTWORK/PATTERN MASTER LIST" at 17933,13567.36 h79
  text ".Via_Count" at 12890.23,13501.75 h40
  text ".Via_Count" at 12890.23,13501.75 h40
  text "VIA'S" at 12514.23,13500.75 h35
  text "VIA'S" at 12514.23,13500.75 h35
  text "LAYERS: TOP AND BOTTOM" at 7382,13441 h130
  text "DRAWING No./CAD FILE REF." at 19786,13417.36 h69
  text "REVISION" at 22392.18,13411.87 h69
  text "DESCRIPTION" at 18150,13410.36 h69
  text "PRINT SCALE" at 12506.23,13350.75 h40
  text "PRINT SCALE" at 12506.23,13350.75 h40
  text "MICROSTRIP IMPLEMENTATION" at 7387,13291 h70
  text ".Print_Scale" at 12888.23,13265.75 h40
  text ".Print_Scale" at 12888.23,13265.75 h40
  text "SCALE" at 12511.23,13264.75 h35
  text "SCALE" at 12511.23,13264.75 h35
  text "TRACK = 20mils" at 7387,13146 h70
  text "SPACE = 4mils" at 7387,13026 h70
  text "DIST. FROM GND PLANES = 47.2mils" at 7387,12911 h70
  text "MANUFACTURE DATA" at 13932.98,12799.05 h40
  text "DIFFERENTIAL" at 7397,12641 h70
  text "IMPEDANCE = ~ 107.6 OHMS" at 7397,12521 h70
  text "REFER TO IMPEDANCE NOTE." at 7397,12215 h100
  text "MANUFACTURER" at 13903.88,9722.17 h50
  text "DATE CODE" at 13977.88,9618.17 h50
  text "POLYIMIDE" at 20923.25,9542.89 h69
  text "FR4-01" at 18869.81,9540 h69
  text "FR4-04" at 19578.81,9540 h69
  text "FR4-08" at 20267.81,9540 h69
  text "ARLON" at 21664.81,9540 h69
  text "MATERIAL:" at 17934.39,9532.9 h75
  text "LEGEND" at 14044.88,9523.17 h50
  text "THICKNESS:" at 18425,9353 h69
  text "~0.8mm" at 19291,9353 h69
  text "2.2mm" at 21378,9353 h69
  text "3.2mm" at 22086,9353 h69
  text "TOLERANCE:" at 18386,9175 h69
  text "OTHER +/-" at 21614,9175 h69
  text "WEEK/YEAR" at 13935.88,9074.17 h60
  text "BOW & TWIST:" at 18268,8998 h69
  text "AS SHOWN" at 21614,8998 h69
  text "10.5mmx5.5mm" at 13890.88,8948.17 h50
  text "COPPER THICKNESS (FINISHED)" at 18110,8820 h69
  text "COMPLETE THE DATE CODE" at 13878.88,8819.17 h30
  text "ON THE LEGEND LAYER" at 13919.88,8749.17 h30
  text "WITH DATE OF MANUFACTURE" at 13860.88,8680.17 h30
  text "18um (1/2oz)" at 19291,8644.5 h69
  text "OUTER:" at 18622,8643 h69
  text "70um (2oz)" at 21614,8643 h69
  text "18um (1/2oz)" at 19291,8467.5 h69
  text "INNER SIGNAL:" at 18287,8466 h69
  text "70um (2oz)" at 21614,8466 h69
  text "18um (1/2oz)" at 19291,8291.5 h69
  text "INNER PWR:" at 18405,8290 h69
  text "70um (2oz)" at 21614,8290 h69
  text "STRUCTURE:" at 17953,8093 h75
  text "REFER" at 19291.16,8093 h69
  text "AS PER DRAWING No." at 19291,7916 h69
  text "NOTE:" at 6330,7896 h70
  text "DRILLING:" at 17953,7758 h75
  text "BOARD" at 6187.6,7703.55 h120
  text "VIEWED FROM:" at 18287,7621 h69
  text "SOLDER SIDE" at 20492,7621 h69
  text "CUTOUTS" at 6087.05,7496.55 h120
  text "REFERENCE:" at 18386,7443 h69
  text "PATTERN MASTER LIST" at 20492,7443 h69
  text "DEFINED ON THE" at 6037.85,7352.56 h75
  text "PTH MINIMUM COPPER THICKNESS:" at 18523,7265 h69
  text "OTHER" at 21614,7265 h69
  text "DRILL GUIDE" at 6061.33,7184.03 h140
  text "NPTH:" at 18661,7087 h69
  text "TENTED" at 19291,7087 h69
  text "PADS REMOVED" at 20492,7087 h69
  text "REMOVE PADS" at 21614,7087 h69
  text "LAYER" at 6303.15,7045.56 h75
  text "NONE" at 22121.87,6910.5 h69
  text "2nd DRILL" at 19291,6909 h69
  text "BOTH" at 20492,6909 h69
  text "ARE 1.7MM DIAMETER" at 5938.23,6899.57 h75
  text "ETCHING" at 19291,6693.5 h69
  text "BOARD FINISH:" at 17953,6692 h75
  text "REFER PATTERN MASTER LIST" at 20492,6692 h69
  text "LEGEND / SCREEN PRINT:" at 18523,6514 h69
  text "NONE" at 20197,6514 h69
  text "BUILD CONFIGURATION AND SPECIFICATIONS SUMMARY" at 11296.23,6362.28 h80
  text "COLOUR:" at 18523,6337 h69
  text "YELLOW" at 20492,6337 h69
  text "OTHER" at 21614,6337 h69
  text "PCB MATERIAL SPEC" at 9156.64,6283.04 h80
  text "2 Layer Build" at 11375.13,6192.78 h60
  text "Silk-Screened White Legend" at 13141.13,6192.78 h60
  text "SOLDER RESIST:" at 18209,6141 h69
  text "LIQUID PHOTOIMAGEABLE" at 19291,6141 h69
  text "5 Thou Tracks / 3 Thou Spacing" at 11375.14,6082.78 h60
  text "DO NOT TRIM Legend (Silkscreen)" at 13141.13,6082.78 h60
  text "24 Thou Via / 0.30mm Hole" at 11375.14,5972.78 h60
  text "Board Thickness Approx 1.6mm" at 13141.14,5972.8 h60
  text "MATTE" at 19879.96,5964.36 h69
  text "COLOUR:" at 18523,5963 h69
  text "BLUE" at 21082,5963 h69
  text "G/Y" at 21614,5963 h69
  text "GREEN" at 20487.26,5959.8 h69
  text "r = TYP 4.1" at 9287.98,5951.3 h100
  text "1 Oz Copper Clad" at 11375.13,5862.78 h60
  text "BOARD OUTLINE Layer Denotes Board Cutout" at 13141.13,5862.78 h60
  text "TRACK FINISH:" at 17953,5767 h75
  text "SELECTIVE SOLDER" at 19291,5767 h69
  text "REFLOW SOLDER" at 20846,5767 h69
  text "3um Immersion Gold" at 11375.13,5752.78 h60
  text "Must be BBT (Bare Board Tested)" at 13141.13,5752.78 h60
  text "Standard FR408 Style Material" at 9252.53,5682.37 h60
  text "Gloss Black Solder Mask" at 11375.13,5642.78 h60
  text "Include BBT Certificate with Order" at 13141.13,5642.78 h60
  text "HASL (HOT AIR SOLDER LEVEL)" at 19291.29,5580.26 h69
  text "Dielectric at 1GHz = TYP 4.2" at 9252.53,5572.37 h60
  text "Include All BBT Failed Boards With Order" at 11376.13,5520.78 h60
  text "FR4 Material Construction" at 9252.53,5462.37 h60
  text "REFER PATTERN MASTER LIST" at 19291,5414 h69
  text "OTHER" at 21074.76,5414 h69
  text "288'C Max. Temperature Capability" at 9252.53,5362.37 h60
  text "IPC-4101A /24 Compliant" at 9252.53,5252.37 h60
  text "Tg by DSC ('C) = 180" at 9252.53,5142.37 h60
  text "HARD GOLD PLATE FINISH" at 19291,5039 h69
  text "OTHER" at 20846,5039 h69
  text "94v0/UL94 Compliant" at 9252.53,5032.37 h60
  text "AS SHOWN" at 19291,4862 h69
  text "REFER" at 20846,4862 h69
  text "PROFILING:" at 17953,4664 h75
  text "LAYER STACK CONFIGURATION" at 12210.09,4552.07 h80
  text "REFER PCB BLANK DWG No." at 19291,4488 h69
  text "USE PROFILE/ ROUTE TAPE SUPPLIED" at 19291,4311 h69
  text "(REFER PATTERN MASTER LIST)" at 21121.26,4310.2 h69
  text "2 LAYER BUILD" at 12641.8,4270.07 h80
  text "SQUARE CUT" at 19291,4134.5 h69
  text "V. SCORE" at 21122,4133 h69
  text "BLANK" at 21929,4133 h69
  text "NOTE:" at 9688.88,4039.55 h70
  text "ACCEPTABILITY:" at 17933,3936 h75
  text "MATERIALS AND WORKMANSHIP FOR" at 19094,3936 h69
  text "ALL PRINTED WIRING BOARDS TO MEE" at 20866,3936 h69
  text "T" at 22657,3935 h69
  text "OR EXCEED THE REQUIREMENTS OF:" at 19075,3818 h69
  text "IMPEDANCE" at 9317,3815 h200
  text "TOP LAYER" at 11765.34,3794.35 h30
  text "TL" at 12266.56,3790.85 h30
  text "-  COPPER CLAD" at 13311.33,3788.69 h30
  text "-  CORE" at 13337.09,3735.87 h30
  text "-  COPPER CLAD" at 13311.33,3681.19 h30
  text "BOTTOM LAYER" at 11766.26,3673.87 h30
  text "BL" at 12266.22,3673.87 h30
  text "1" at 21063.5,3660 h69
  text "3" at 21732.5,3660 h69
  text "CONTROLLED LAYERS" at 9291.88,3650.55 h75
  text "LAYERS TOP AND BOTTOM" at 9303,3503 h90
  text "UL CERTIFICATION" at 19290.5,3482 h69
  text "AUSTEL" at 21102.5,3482 h69
  text "A" at 20433.58,3305.67 h69
  text "B" at 20748.58,3305.67 h69
  text "MIL-P-55110E GRP" at 19290.5,3305 h69
  text "AS2546" at 21096.9,3305 h69
  text "OTHER" at 21889.9,3305 h69
  text "IMPEDANCE =" at 9501,3197 h70
  text "ADDITIONAL REQUIREMENTS:" at 17930,3145 h75
  text "100 OHMS +/- 10%" at 9327,3060 h70
  text "MICROSECTION:" at 18189,3010 h69
  text "SAMPLE PLAN" at 19822.76,3010 h69
  text "MIL-P-55110E SERIAL Nos. PER ORDER" at 20846.45,3010 h69
  text "MIL-P-55110E GRP" at 19822,2832.56 h69
  text "A" at 20965.08,2833.23 h69
  text "B" at 21280.08,2833.23 h69
  text "CERTIFICATION:" at 18189,2832 h69
  text "NONE" at 19290.5,2832 h69
  text "IPC CLASS:" at 21436,2832 h69
  text "1" at 22205,2832 h69
  text "3" at 22874,2832 h69
  text "TOTAL BOARD THICKNESS: APPROX" at 12115.25,2744.87 h30
  text "1.2mm" at 12949.25,2744.86 h30
  text "(47.244mil)" at 13123.95,2745.47 h30
  text "ADJUST DIELECTRIC THICKNESS" at 9317,2737 h50
  text "QUALITY RELEASE REPORT" at 19822,2654 h69
  text "TO MEET SPECIFIED IMPEDANCE" at 9313,2633 h50
  text "ELECTRICAL TEST: Bare Board" at 18189,2477 h66.93
  text "NONE" at 19822,2477 h69
  text "PER ORDER" at 21633,2477 h69
  text "MIN. PITCH" at 21634,2300.17 h69
  text "SURFACE MOUNT:" at 18189,2299 h69
  text "NONE" at 19822,2299 h69
  text "1 SIDE" at 20385.96,2296.86 h69
  text "MANUFACTURER'S ID/LOGO:" at 18189,2123 h69
  text "NONE" at 19822,2123 h69
  text "FOIL" at 20412.31,2123 h69
  text "REFER" at 21634,2123 h69
  text "NONE" at 21438,1945 h69
  text "MANUFACTURER'S ACCREDITATION:" at 18189,1925 h69
  text "PACKAGING AND HANDLING:" at 18189,1749 h69
  text "REFER" at 20841,1749 h69
Mechanical 7:
  drawing of 1016 lines, arcs and shapes, not listed
  text "1" at 2126,16181 h118
  text "2" at 4960,16181 h118
  text "3" at 7795,16181 h118
  text "4" at 10511,16181 h118
  text "5" at 13346,16181 h118
  text "6" at 16102,16181 h118
  text "7" at 18937,16181 h118
  text "8" at 21850,16181 h118
  text "NANOBOARD" at 1660,15683 h120
  text "DT01.02" at 4818.75,15679.48 h140
  text "A" at 826,14921 h118
  text "A" at 23031,14921 h118
  text "IDENTIFICATION DATA" at 13932.98,12681.05 h40
  text "B" at 846,12166 h118
  text "B" at 23051,12166 h118
  text "C" at 846,9606 h118
  text "C" at 23051,9606 h118
  text "D" at 846,6890 h118
  text "D" at 23051,6890 h118
  text "mm" at 591,6496 h79 r90
  text "E" at 846,4232 h118
  text "E" at 23051,4232 h118
  text "0" at 591,2441 h79 r90
  text "DO NOT" at 217,1890 h79
  text "SCALE" at 236,1752 h79
  text "DIMENSIONS" at 98,1555 h79
  text "F" at 846,1516 h118
  text "F" at 23051,1516 h118
  text "SCALE:" at 21376.7,1457.08 h70
  text "ALTIUM LIMITED" at 15308.95,1440.88 h70
  text "DESIGNER" at 14414.66,1438.71 h70
  text "DATE" at 16887.86,1434.08 h70
  text "LEVEL 3 / 12A RODBOROUGH ROAD" at 18204.55,1429.54 h62.99
  text "IN" at 354,1417 h79
  text "FRENCHS FOREST - SYDNEY 2086" at 18202.77,1335.16 h62.99
  text ".Print_Scale" at 21772.96,1282.87 h100
  text "MILLIMETRES" at 79,1260 h79
  text "NSW AUSTRALIA" at 18203.95,1247.12 h62.99
  text "DRAWN" at 14412.86,1241.08 h70
  text "08.SEPT.07" at 16785.96,1236.87 h70
  text "Steven. R. Howell" at 15307.66,1235.71 h70
  text "DATE:" at 21373.7,1063.37 h70
  text "01.APR.08" at 13793.91,1052.03 h70
  text "UPDATED WITH HOT PLUG CAPABILITY" at 7977.85,1050.85 h70
  text "S.HOWELL" at 13214.84,1048.84 h70
  text "2" at 7486.86,1046.83 h70
  text "CHECKED" at 14412.86,1047.08 h70
  text "Steven. R. Howell" at 15301.96,1042.87 h70
  text "INDEX" at 17555.96,1042.87 h70
  text "08.SEPT.07" at 16785.96,1036.87 h70
  text ".Print_Date" at 21742.96,907.87 h100
  text "08.SEPT.07" at 13793.91,854.03 h70
  text "DESIGN CREATED" at 7977.85,852.85 h70
  text "S.HOWELL" at 13214.84,850.84 h70
  text "1" at 7486.86,848.83 h70
  text "ALTIUM DEVELOPMENT PRODUCTS" at 15655.96,848.87 h70
  text "CUSTOMER" at 14410.96,839.87 h70
  text "Title:" at 17558.86,835.78 h80
  text "SHEET" at 21377.17,669.67 h70
  text "DT01.01 - DEVELOPMENT TOOL 01.02" at 17572.97,662.85 h90
  text "REVISION" at 7337.84,651.84 h70
  text "DESCRIPTION OF TASK OR MODIFICATION" at 10159.84,651.84 h70
  text "DATE" at 13896.73,632.67 h70
  text "APPD" at 13306.18,630.42 h70
  text "A2" at 22728.86,544.08 h78.74
  text ".Pcb_File_Name" at 9629.96,463.9 h70
  text ".Printout_Name" at 8024.96,448.87 h70
  text "TEMPLATE: -" at 7337.84,446.84 h70
  text "1" at 2126,236 h118
  text "2" at 4960,236 h118
  text "3" at 7795,236 h118
  text "4" at 10511,236 h118
  text "5" at 13346,236 h118
  text "6" at 16102,236 h118
  text "7" at 18937,236 h118
  text "8" at 21850,236 h118
Mechanical 15:
  rectangle: 13672.98,12536.05 13862.98,12631.05
  lines w5: 13672.98,12536.05 13672.98,12631.05 14592.98,12631.05 14592.98,12536.05 13672.98,12536.05
  text "DIMENSIONS" at 13932.98,12563.05 h40
Drill Drawing:
  rectangle: 13672.98,13244.05 13862.98,13339.05
  lines w0.39: 10508.24,8378.48 cw(c10508.24,8516.27) 10508.24,8654.07 10738.55,8654.07 cw(c10738.55,8634.38) 10758.24,8634.38 10758.24,8601.11 10758.24,8398.16 cw(c10738.55,8398.16) 10738.55,8378.48 10508.24,8378.48 ; 10508.24,10032.02 cw(c10508.24,10169.82) 10508.24,10307.61 10738.55,10307.61 cw(c10738.55,10287.93) 10758.24,10287.93 10758.24,10084.97 10758.24,10051.71 cw(c10738.55,10051.71) 10738.55,10032.02 10508.24,10032.02
  lines w5: 9328.42,9182.61 ccw(c11116.51,9343.04) 9388.86,8854.97 ccw(c10303.51,10107.8) 9633.7,8708.68 cw(c9616.7,8673.17) 9654.65,8662.69 9631.51,8578.94 ccw(c11007.41,11111.18) 10303.15,8316.66 10312.86,8356.21 cw(c10339.63,8349.64) 10366.39,8343.07 10356.73,8303.7 ccw(c11007.41,11111.18) 11097.83,8230.7 11044.32,8363.83 cw(c11080.85,8378.51) 11080.68,8417.88 ccw(c11063.75,12502.73) 11376.58,8429.84 ccw(c8605.87,9343.04) 11463.13,8754.11 11463.13,9931.98 ccw(c8605.87,9343.04) 11376.58,10256.24 ccw(c11063.75,6183.36) 11080.68,10268.2 cw(c11080.85,10307.57) 11044.32,10322.26 11097.83,10455.38 ccw(c11007.41,7574.91) 10356.73,10382.38 10366.39,10343.02 cw(c10339.63,10336.45) 10312.86,10329.88 10303.15,10369.43 ccw(c11007.41,7574.91) 9631.51,10107.14 9654.65,10023.4 cw(c9616.7,10012.92) 9633.7,9977.41 ccw(c10303.51,8578.29) 9388.86,9831.12 ccw(c11116.51,9343.04) 9328.42,9503.48 9636.2,9503.48 cw(c9636.2,9483.79) 9655.89,9483.79 9655.89,9202.3 cw(c9636.2,9202.3) 9636.2,9182.61 9328.42,9182.61 ; 13672.98,13244.05 13672.98,13339.05 14592.98,13339.05 14592.98,13244.05 13672.98,13244.05
  text "DRILL DRAWING" at 13932.98,13271.05 h40
  text ".Legend" at 1120.03,501.08 h68.9

## Dimensions
11376.58,8429.84 to 11097.83,10455.38 on Mechanical 1
11463.13,9931.98 to 9328.42,9503.48 on Mechanical 1

## Text inside footprints (layer, text, board x,y; h text height)
LED1: Top Overlay "B" at 11040.09,10171.66 h31.5; Top Overlay "R" at 11040.09,10213.84 h31.5; Top Overlay "A" at 11037,10130.1 h45; Top Overlay "G" at 11038.91,10085.1 h31.5
LED2: Top Overlay "B" at 11035,8526 h31.5; Top Overlay "R" at 11035,8568 h31.5; Top Overlay "A" at 11032,8487 h40; Top Overlay "G" at 11032.09,8442.11 h31.5
PBFREE: Bottom Overlay "Pb" at 9703.6,9646.1 h120